# Altium PCB Driver_BLDC.PcbDoc (part 4 of 4)
Units mm, origin at the board's own origin, x right, y up, seen from the top; angles counter-clockwise.
Board outline 320 x 180.01 mm, 2 copper layers (Top Layer, Bottom Layer), stack 1.371 mm thick; 421 components, 171 nets, 1112 pads, 449 vias.
Unrouted connection lines stored in the file: 1.
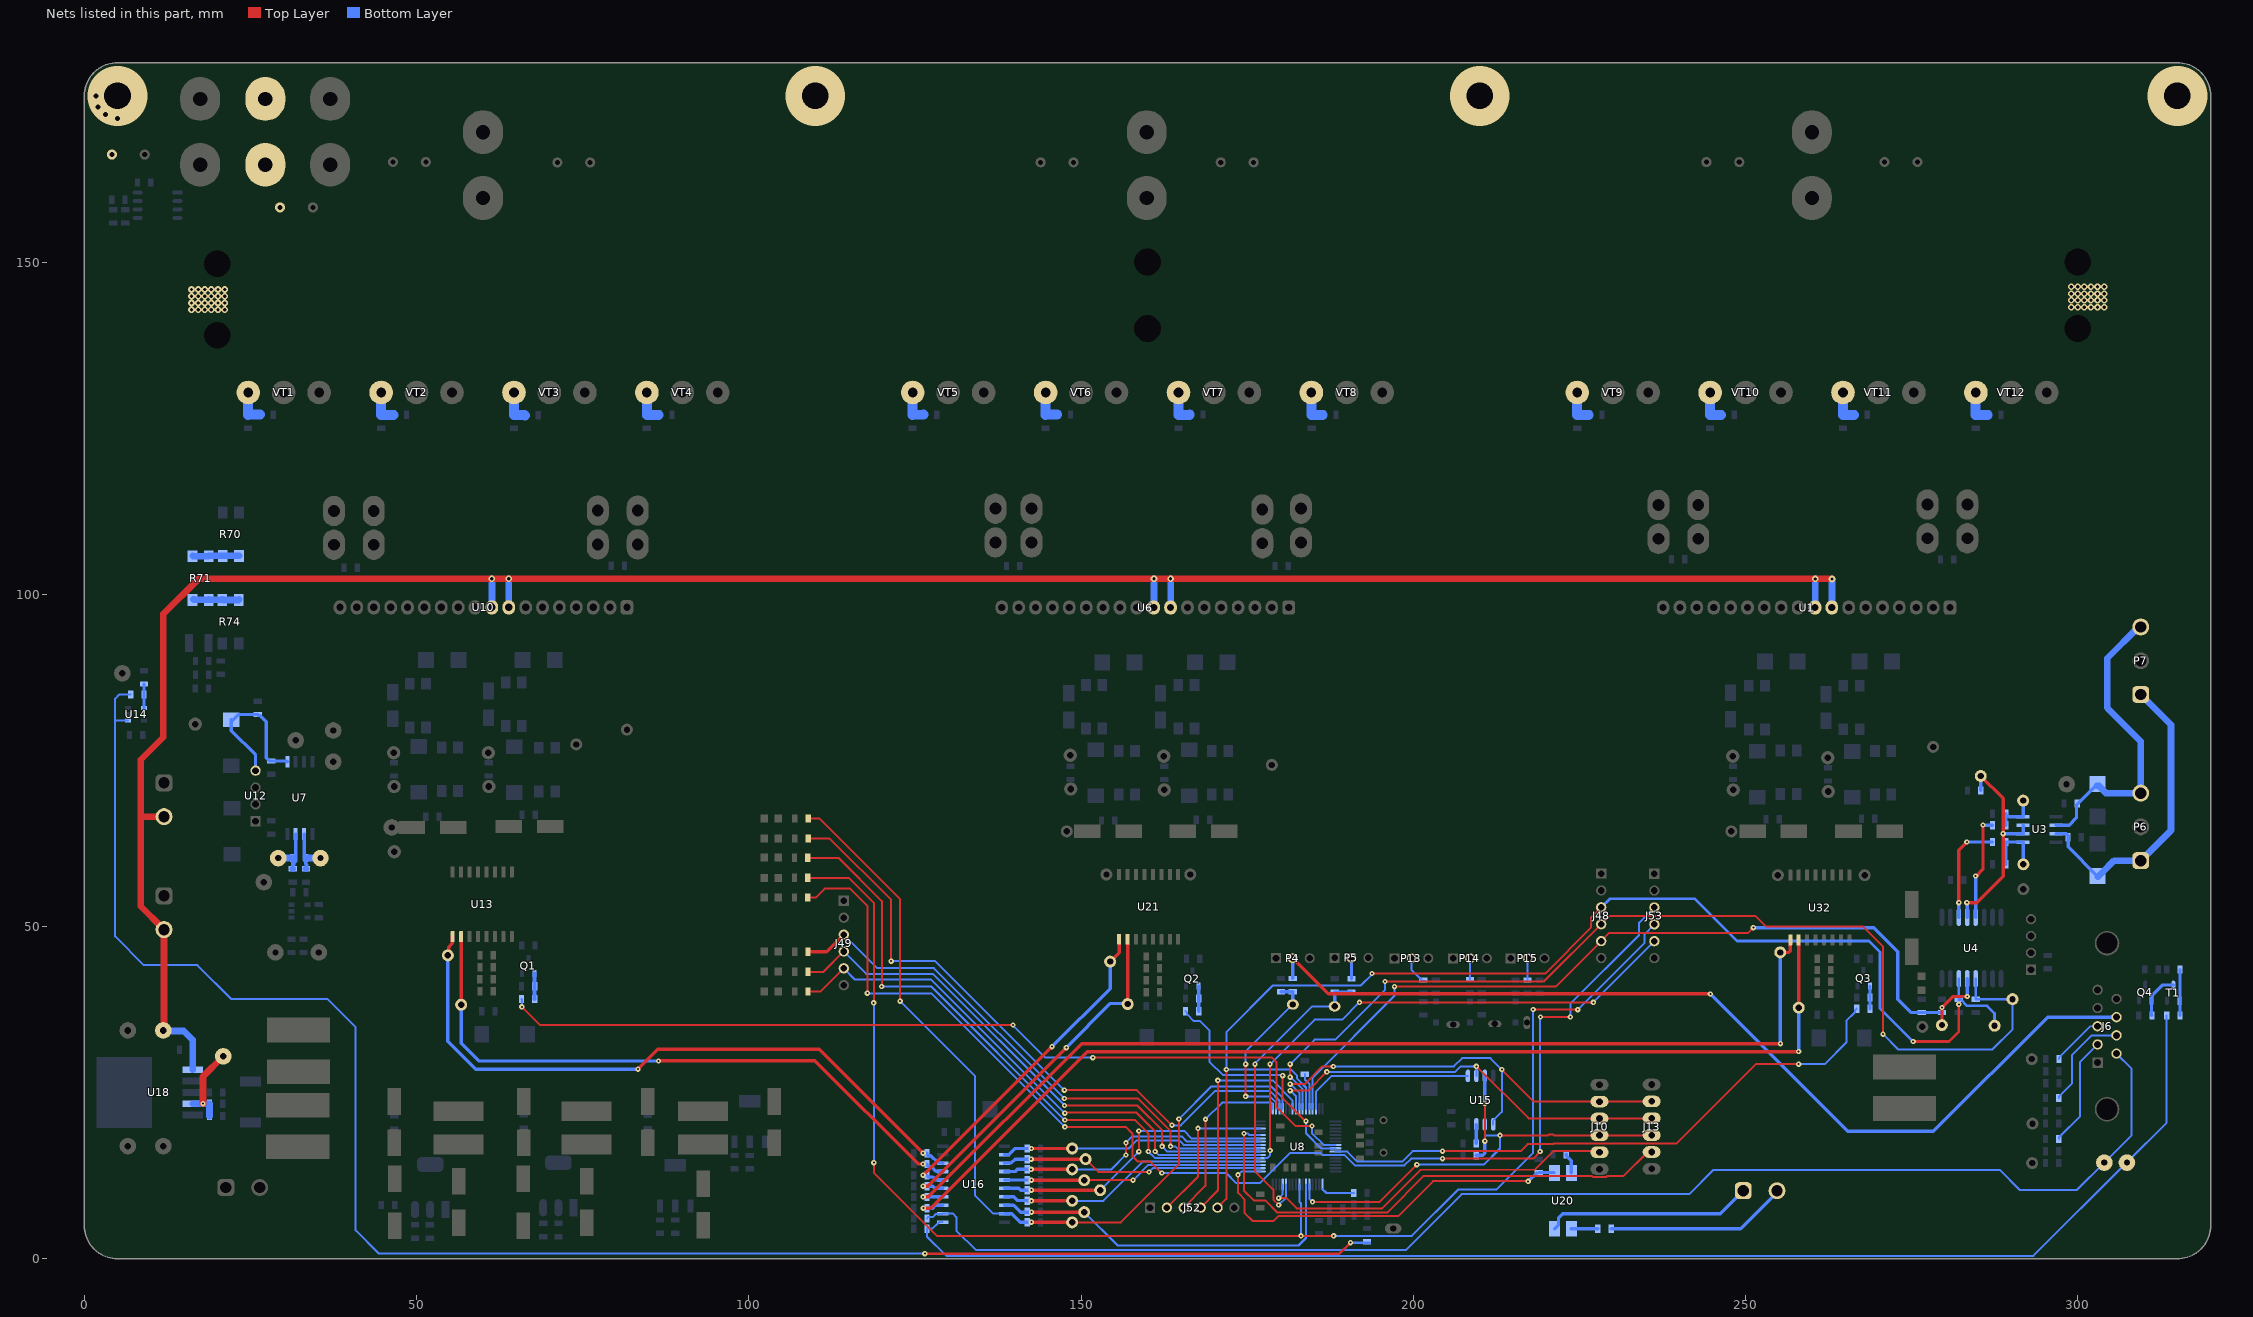
[diagram p3: the nets of this part, all layers, seen from the top]

## Via types
v1: diameter 1, hole 0.5, Top Layer to Bottom Layer, 222 vias
v2: diameter 0.8, hole 0.3, Top Layer to Bottom Layer, 162 vias
v3: diameter 0.8, hole 0.3, Top Layer to Bottom Layer, tented both sides, 29 vias
v4: diameter 1, hole 0.5, Top Layer to Bottom Layer, tented both sides, 21 vias
v5: diameter 1.27, hole 0.711, Top Layer to Bottom Layer, 5 vias
v6: diameter 9, hole 4, Top Layer to Bottom Layer, 4 vias
v7: diameter 0.6, hole 0.3, Top Layer to Bottom Layer, 3 vias
v8: diameter 2, hole 1, Top Layer to Bottom Layer, 1 vias
v9: diameter 0.7, hole 0.3, Top Layer to Bottom Layer, tented both sides, 1 vias
v10: diameter 1, hole 0.54, Top Layer to Bottom Layer, 1 vias

## Nets (pads, with @x,y where several pads share a name; then routed paths per layer and width w, separated by ;. In a path a pad name is that pad's centre, name@x,y a point inside that pad or via, vN(x,y) a via of type N, cw(c..) or ccw(c..) an arc to the next point about the centre after c; other vN are vias at no path point) (continued)
NetJ6_2: J6.2 R3.1 | length 16.6
  Bottom Layer w0.3: R3.1@297.15,18.025 297.15,18.25 297.4,18.5 300.3,21.4 300.3,29.57 J6.2@302.985,32.255
NetJ6_3: J6.3 R1.1 | length 8
  Bottom Layer w0.3: R1.1@297.161,30.054 297.161,30.279 297.411,30.529 297.429,30.529 301.895,34.995 J6.3@302.985,34.995
NetJ6_6: J6.6 R34.2 TP65.1 U16.12 | length 207.7
  Bottom Layer w0.3: R34.2@126.805,6.093 R34.2@126.82,6.077 ; R34.2@126.97,6.258 127.678,6.258 128.176,6.757 129.146,6.757 U16.12@129.171,6.782 130.743,6.782 131.252,6.273 131.252,4.248 134.2,1.3 198.85,1.3 207.275,9.725 241.525,9.725 245.175,13.375 288.25,13.375 291.275,10.35 299.875,10.35 TP65.1@304.005,14.48 308.05,18.525 308.05,28.66 J6.6@305.825,30.885
NetJ6_7: J6.7 R2.1 | length 15.2
  Bottom Layer w0.3: R2.1@297.15,24.189 297.15,24.414 297.4,24.664 297.414,24.664 299.095,26.345 299.095,30.645 302.075,33.625 J6.7@305.825,33.625
NetJ6_8: J6.8 P4.2 R22.1 | length 144.9
  Top Layer w0.5: P4.2@181.871,45.237 187.233,39.875 244.675,39.875 v2(244.7,39.85)
  Bottom Layer w0.5: R22.1@181.871,42.193 P4.2@181.871,45.237 ; v2(244.7,39.85) 265.375,19.175 278.275,19.175 295.465,36.365 J6.8@305.825,36.365
NetJ10_2: J10.2 J13.2 U8.57 U15.5 | length 71
  Top Layer w0.3: v2(181.468,26.278) 183.645,26.278 186.314,28.947 v2(187.977,28.947) ; v2(213.325,28.475) 218.14,23.66 J10.2@227.946,23.66 ; J10.2@228.024,23.66 J13.2@235.124,23.66
  Bottom Layer w0.3: v2(181.468,26.278) 181.546,26.278 182.851,24.973 U8.57@182.851,22.573 ; v2(187.977,28.947) 206.097,28.947 207.349,30.2 211.6,30.2 v2(213.325,28.475) 213.325,22.111 212.03,20.816 U15.5@212.03,20.225
NetJ10_3: J10.3 J13.3 U8.56 U15.2 | length 62.8
  Top Layer w0.3: v2(181.468,25.298) 184.173,25.298 v2(187,28.125) ; v2(209.49,28.975) 217.345,21.12 J13.3@235.124,21.12
  Bottom Layer w0.3: v2(181.468,25.298) 181.529,25.298 182.351,24.475 U8.56@182.351,22.573 ; v2(187,28.125) 187.05,28.075 206.259,28.075 207.16,28.975 v2(209.49,28.975) ; U15.2@209.49,27.525 v2@209.49,28.725
NetJ10_4: J10.4 J13.4 U8.21 U15.6 | length 62.4
  Top Layer w0.3: v2(184.835,8.569) 194.94,8.569 v2(200.537,14.165) ; v2(213.05,18.575) 213.055,18.58 220.298,18.58 220.423,18.705 221.027,18.705 221.152,18.58 J10.4@228.024,18.58 J13.4@235.124,18.58
  Bottom Layer w0.3: U8.21@184.351,11.19 184.351,9.053 v2(184.835,8.569) ; v2(200.537,14.165) 210.621,14.165 213.05,16.595 v2(213.05,18.575) 210.936,18.575 210.76,18.751 U15.6@210.76,20.225
NetJ10_5: J10.5 U8.29 | length 54.8
  Top Layer w0.3: v3(179.741,9.132) 180.929,9.132 182.462,7.6 195.325,7.6 201.125,13.4 218.3,13.4 221.09,16.19 J10.5@228.024,16.19
  Bottom Layer w0.3: v3(179.741,9.132) 179.793,9.132 180.351,9.69 U8.29@180.351,11.19
NetJ13_5: J13.5 U8.44 | length 77.7
  Top Layer w0.3: v3(174.525,18.861) 174.525,10.273 176.048,8.75 177.766,8.75 179.566,6.95 196.075,6.95 201.604,12.479 226.866,12.479 227.05,12.295 228.998,12.295 229.182,12.479 231.658,12.479 235.244,16.065 J13.5@235.865,16.065
  Bottom Layer w0.3: v3(174.525,18.861) 175.1,18.861 175.33,18.631 U8.44@176.91,18.631
NetJ48_3: J48.3 J52.5 R25.1 TP14.1 U4.6 U8.59 | length 194.3
  Top Layer w0.3: J52.5@170.54,7.7 171.875,9.035 v2(171.875,28.5) ; v2(193.8,42.925) 193.824,42.949 194.426,42.949 194.451,42.925 219.832,42.925 226.775,49.868 226.775,51.386 J48.3@228.279,52.89
  Top Layer w0.4: v2(275.225,32.7) 280.625,32.7 282.095,34.17 v2(282.095,38.3)
  Bottom Layer w0.3: U8.59@183.851,22.573 183.851,25.775 182.507,27.119 182.507,27.568 181.576,28.5 v2(171.875,28.5) 171.875,34.125 178.877,41.127 192.077,41.127 193.8,42.85 v2(193.8,42.925)
  Bottom Layer w0.4: J48.3@228.279,52.89 229.564,54.175 242.375,54.175 248.73,47.82 268.555,47.82 270.225,46.15 270.225,37.7 v2(275.225,32.7) ; v2(282.095,38.3) R25.1@282.095,39.078 ; U4.6@282.096,42.143 R25.1@282.095,39.078 ; TP14.1@287.475,34.535 TP14.1@287.475,35.075 287.475,36.931 286.328,38.078 283.32,38.078 282.32,39.078 R25.1@282.095,39.078 ; TP14.1@287.793,34.935 TP14.1@287.88,35.131
NetJ48_4: J48.4 R28.1 TP11.1 U4.4 U8.58 | length 156.7
  Top Layer w0.3: v2(181.468,27.327) v2(181.468,29.299) ; v2(195.75,41.727) 219.656,41.727 J48.4@228.279,50.35 229.539,51.61 251.49,51.61 253.075,50.025 267.609,50.025 270.7,46.934 v2(270.7,33.8)
  Bottom Layer w0.3: v2(181.468,27.327) 181.528,27.327 183.351,25.504 U8.58@183.351,22.573 ; v2(181.468,29.299) 185.144,32.975 188.25,32.975 195.75,40.475 v2(195.75,41.727) ; v2(270.7,33.8) 273,31.5 287.145,31.5 290.18,34.535 TP11.1@290.18,39.078
  Bottom Layer w0.4: R28.1@284.635,39.078 TP11.1@290.18,39.078 ; R28.1@284.635,39.078 U4.4@284.636,42.143
NetJ48_5: J48.5 R39.2 R40.2 TP10.1 U4.5 U8.61 | length 129.5
  Top Layer w0.3: v2(197.177,40.952) 221.421,40.952 J48.5@228.279,47.81 229.519,49.05 250.4,49.05 v2(251.175,49.825)
  Top Layer w0.5: TP10.1@279.555,35.172 v3(279.555,37.808) 281.225,39.478 v3(283.366,39.478)
  Bottom Layer w0.3: U8.61@184.851,22.573 184.851,27.254 197.177,39.58 v2(197.177,40.952)
  Bottom Layer w0.5: v2(251.175,49.825) 269.3,49.825 272.898,46.227 272.898,39.077 274.897,37.078 R39.2@276.52,37.078 R40.2@279.555,37.078 v3(279.555,37.808) ; v3(283.366,39.478) U4.5@283.366,42.143
NetJ49_3: J49.3 R12.2 U8.40 | length 83.7
  Top Layer w0.3: v2(147.482,24.132) 158.518,24.132 163.475,19.175 v2(163.475,16.925)
  Top Layer w0.5: R12.2@108.905,46.19 111.7,46.19 J49.3@114.3,48.79
  Bottom Layer w0.3: J49.3@114.3,48.79 119.34,43.75 127.865,43.75 v2(147.482,24.132) ; v2(163.475,16.925) 164.2,16.925 164.494,16.631 U8.40@176.91,16.631
NetJ49_4: J49.4 R11.2 U8.39 | length 83.2
  Top Layer w0.3: R11.2@108.905,43.19 111.24,43.19 J49.4@114.3,46.25 ; v2(147.516,23.066) 158.484,23.066 162.2,19.35 v2(162.2,16.925)
  Bottom Layer w0.3: J49.4@114.3,46.25 117.675,42.875 127.707,42.875 v2(147.516,23.066) ; v2(162.2,16.925) 162.994,16.131 U8.39@176.91,16.131
NetJ49_5: J49.5 R10.2 U8.38 | length 83
  Top Layer w0.3: R10.2@108.905,40.19 110.78,40.19 J49.5@114.3,43.71 ; v2(147.549,21.921) 147.645,22.017 147.967,22.017 147.975,22.025 158.275,22.025 161.132,19.168 161.132,16.175 v2(161.151,16.157)
  Bottom Layer w0.3: J49.5@114.3,43.71 115.985,42.025 127.446,42.025 v2(147.549,21.921) ; v2(161.151,16.157) 161.151,16.107 161.626,15.631 U8.38@176.91,15.631
NetJ52_2: J52.2 U8.46 | length 23.2
  Top Layer w0.3: J52.2@162.92,7.7 167.6,12.38 v2(167.6,19.625)
  Bottom Layer w0.3: v2(167.6,19.625) 167.606,19.631 U8.46@176.91,19.631
NetJ52_3: J52.3 U8.49 | length 26.6
  Top Layer w0.3: J52.3@165.46,7.7 168.725,10.965 v2(168.725,21)
  Bottom Layer w0.3: v2(168.725,21) 171.225,23.5 178.669,23.5 178.845,23.325 178.845,23.32 178.851,23.314 U8.49@178.851,22.573
NetJ52_4: J52.4 U8.55 | length 34
  Top Layer w0.3: J52.4@168,7.7 170.575,10.275 v2(170.575,26.85)
  Bottom Layer w0.3: v2(170.575,26.85) 178.818,26.85 181.851,23.817 U8.55@181.851,22.573
NetJ53_3: J53.3 R7.2 U8.11 | length 188.8
  Top Layer w0.3: R7.2@108.88,54.366 110.092,54.366 111.419,55.692 115.267,55.692 117.851,53.109 v2(117.85,39.975) ; v2(147.549,19.85) 156.739,19.85 157.731,18.857 157.731,15.469 158.569,14.631 160.398,14.631 162.128,12.901 v2(162.15,12.901) ; v2(204.391,15.071) 218.021,15.071 v2(219.1,16.15) ; v2(219.15,36.375) 223.6,36.375 v2(223.625,36.4)
  Bottom Layer w0.3: v2(117.85,39.975) 117.875,39.95 127.449,39.95 v2(147.549,19.85) ; v2(162.15,12.901) 162.164,12.915 171.835,12.915 173.35,11.4 176.895,11.4 179.205,13.71 179.213,13.71 181.454,15.95 186.001,15.95 186.32,15.631 U8.11@188.292,15.631 189.628,15.631 191.209,14.05 198.65,14.05 199.671,15.071 v2(204.391,15.071) ; v2(219.1,16.15) 219.1,36.325 v2(219.15,36.375) ; v2(223.625,36.4) 223.625,38.375 233.975,48.725 233.975,50.576 J53.3@236.279,52.88
NetJ53_4: J53.4 R8.2 U8.24 | length 214.2
  Top Layer w0.3: R8.2@108.88,57.366 108.904,57.341 115.034,57.341 118.825,53.55 118.825,38.534 v2(118.8,38.509) ; v2(118.825,14.475) 118.825,12.92 128.295,3.45 v2(183.105,3.45) v2(188.025,3.45) ; v2(218.05,37.525) 218.075,37.5 v2(224.75,37.5)
  Bottom Layer w0.3: v2(118.8,38.509) 118.825,38.484 v2(118.825,14.475) ; U8.24@182.851,11.19 182.851,8.576 183.105,8.322 v2(183.105,3.45) ; v2(188.025,3.45) 199.8,3.45 206.8,10.45 212.543,10.45 218.05,15.957 v2(218.05,37.525) ; v2(224.75,37.5) 234.8,47.55 234.8,48.861 J53.4@236.279,50.34
NetJ53_5: J53.5 R9.2 U8.37 | length 176.1
  Top Layer w0.3: R9.2@108.88,60.366 108.928,60.317 113.508,60.317 120.017,53.808 120.017,40.992 v2(120,40.975) ; v2(147.55,20.9) 158.082,20.9 159.555,19.427 160.125,18.857 v2(160.125,16.15) ; v2(178.45,29.3) v2(178.45,29.3) v2(178.451,16.288) ; v2(191.9,38.6) v2(227.1,38.6)
  Bottom Layer w0.3: v2(120,40.975) 127.425,40.975 147.5,20.9 v2(147.55,20.9) ; v2(160.125,16.15) 161.144,15.131 U8.37@176.91,15.131 ; U8.37@177.648,15.118 177.675,15.145 178.033,15.145 178.451,15.563 v2(178.451,16.288) ; v2(178.45,29.3) 185.15,36 189.3,36 v2(191.9,38.6) ; v2(227.1,38.6) 236.275,47.775 J53.5@236.275,47.8
NetP1_1: P1.1 U20.2 | length 31.4
  Bottom Layer w0.5: U20.2@221.255,4.525 221.855,5.125 221.855,6.155 222.5,6.8 246.21,6.8 P1.1@249.66,10.25
NetP1_2: P1.2 R127.1 | length 27.5
  Bottom Layer w0.5: R127.1@229.775,4.525 249.25,4.525 254.74,10.015 P1.2@254.74,10.25
NetP5_2: P5.2 R23.1 | length 3.2
  Bottom Layer w0.5: R23.1@190.701,42.127 P5.2@190.701,45.287
NetP6_1: P6.1 P7.1 R41.2 U3.7 ZD2.1 | length 46
  Bottom Layer w0.5: U3.7@296.711,63.982 298.261,63.982 298.548,63.695 298.548,61.978 ZD2.1@302.946,57.581
  Bottom Layer w1: ZD2.1@303.034,57.492 303.558,58.016 305.462,59.92 P6.1@309.475,59.92 ; P7.1@309.475,84.92 314.025,80.37 314.025,64.47 P6.1@309.519,59.964
NetP6_3: P6.3 P7.3 R24.1 U3.6 ZD1.1 | length 46.4
  Bottom Layer w0.5: U3.6@296.711,65.252 296.726,65.267 298.7,65.267 299.796,66.363 299.796,68.278 299.97,68.452 ZD1.1@302.946,71.428
  Bottom Layer w1: ZD1.1@302.858,71.168 303.205,71.168 303.646,70.728 303.646,70.666 304.231,70.08 P6.3@309.475,70.08 309.475,77.85 304.425,82.9 304.425,90.375 309.13,95.08 P7.3@309.475,95.08
NetP13_2: P13.2 R120.1 | length 4.4
  Bottom Layer w0.3: P13.2@199.717,45.225 199.717,43.517 201.431,41.802 R120.1@201.656,41.802
NetP14_2: P14.2 R121.1 | length 3.2
  Bottom Layer w0.3: R121.1@208.532,42.027 P14.2@208.532,45.225
NetP15_2: P15.2 R122.1 | length 3.4
  Bottom Layer w0.3: P15.2@217.1,45.123 P15.2@217.202,45.225 R122.1@217.202,41.952
NetQ1_1: Q1.1 R84.2 R88.1 | length 3.8
  Bottom Layer w0.6: R84.2@67.784,39.083 Q1.1@67.784,42.914
NetQ2_1: Q2.1 R111.2 R113.1 | length 3.8
  Bottom Layer w0.5: R111.2@167.71,37.269 Q2.1@167.71,41.02
NetQ3_1: Q3.1 R140.2 R143.1 | length 3.4
  Bottom Layer w0.5: R140.2@268.724,37.631 Q3.1@268.725,41.053
NetQ4_1: Q4.1 R48.2 T1.3 | length 7
  Bottom Layer w0.5: R48.2@311.174,36.6 311.099,36.675 311.099,39.626 311.15,39.677 311.201,39.677 312.724,41.2 T1.3@314.374,41.2
NetR13_2: R13.2 U15.7 | length 2.9
  Bottom Layer w0.5: R13.2@209.475,17.35 U15.7@209.475,20.21
NetR14_2: R14.2 U15.3 | length 13.1
  Top Layer w0.3: v2(210.76,17.7) v2(210.76,23.375)
  Bottom Layer w0.5: R14.2@209.475,15.574 R14.2@209.625,15.574 ; R14.2@209.625,15.575 210.467,15.575 210.775,15.882 210.775,17.685 v2(210.76,17.7) ; v2(210.76,23.375) U15.3@210.76,27.525
NetR15_2: R15.2 R47.2 TP4.1 U8.52 U16.9 | length 130.9
  Top Layer w0.3: R47.2@108.929,66.255 110.646,66.254 122.775,54.125 v2(122.775,38.775) ; v2(142.521,5.512) v2@142.556,5.477 ; TP4.1@148.66,5.477 156.002,5.477 164.725,14.2 v2(164.725,21.025)
  Top Layer w0.5: v2@142.556,5.477 TP4.1@148.66,5.477
  Bottom Layer w0.3: v2(122.775,38.775) 134.025,27.525 134.025,9.575 136.818,6.782 U16.9@138.471,6.782 U16.9@138.488,6.766 ; v2(164.725,21.025) 169.625,25.925 178.639,25.925 180.351,24.213 U8.52@180.351,22.573
  Bottom Layer w0.5: U16.9@138.488,6.766 139.588,6.766 140.842,5.512 v2(142.521,5.512)
NetR16_2: R16.2 TP12.1 U8.22 U16.8 | length 56.4
  Top Layer w0.3: v2(142.556,7.008) v2@142.576,7.027
  Top Layer w0.5: v2@142.576,7.027 TP12.1@150.475,7.027
  Bottom Layer w0.3: TP12.1@150.475,7.027 155.502,2 182.725,2 183.851,3.126 U8.22@183.851,11.19
  Bottom Layer w0.5: U16.8@138.471,8.052 139.847,8.052 140.891,7.008 v2(142.556,7.008)
NetR17_2: R17.2 TP15.1 U8.36 U16.7 | length 41
  Top Layer w0.5: v2(142.521,8.727) TP15.1@148.66,8.727
  Bottom Layer w0.3: TP15.1@148.66,8.727 153.352,8.727 159.256,14.631 U8.36@176.794,14.631
  Bottom Layer w0.5: U16.7@138.471,9.322 139.876,9.322 140.421,8.777 141.846,8.777 R17.2@141.896,8.727 v2(142.521,8.727)
NetR18_2: R18.2 TP17.1 U8.43 U16.6 | length 44.2
  Top Layer w0.3: v2(158.7,16.125) 158.725,16.15 158.725,19.22 v2(158.7,19.245)
  Top Layer w0.5: v2(142.521,10.317) TP17.1@152.686,10.317
  Bottom Layer w0.3: TP17.1@152.871,10.317 v2@158.679,16.125 ; v2(158.7,19.245) 165.505,19.245 166.619,18.131 U8.43@176.794,18.131
  Bottom Layer w0.5: U16.6@138.471,10.592 140.616,10.592 140.891,10.317 R18.2@141.896,10.317 ; R18.2@141.896,10.317 v2(142.521,10.317)
NetR19_2: R19.2 TP18.1 U8.35 U16.5 | length 39.4
  Top Layer w0.3: TP18.1@150.475,11.827 150.477,11.825 v2(157.825,11.825)
  Top Layer w0.5: v2(142.521,11.827) TP18.1@150.475,11.827
  Bottom Layer w0.3: v2(157.825,11.825) 160.125,14.125 160.621,14.125 175.042,14.125 175.048,14.131 U8.35@176.91,14.131
  Bottom Layer w0.5: U16.5@138.471,11.862 142.486,11.862 v2(142.521,11.827)
NetR20_2: R20.2 TP19.1 U8.42 U16.4 | length 42
  Top Layer w0.3: v2(156.756,15.631) v2(156.756,17.45)
  Top Layer w0.5: v2(142.486,13.457) TP19.1@148.66,13.457
  Bottom Layer w0.3: TP19.1@148.66,13.457 154.582,13.457 v2(156.756,15.631) ; v2(156.756,17.45) 157.731,18.425 165.15,18.425 165.944,17.631 U8.42@176.91,17.631
  Bottom Layer w0.5: U16.4@138.471,13.132 140.096,13.132 140.421,13.457 R20.2@141.896,13.457 v2(142.486,13.457)
NetR21_2: R21.2 TP27.1 U8.34 U16.3 | length 39.7
  Top Layer w0.3: TP27.1@150.683,15.002 152.635,13.05 v2(160.225,13.05)
  Top Layer w0.5: v2(142.486,15.002) TP27.1@150.683,15.002
  Bottom Layer w0.3: v2(160.225,13.05) 160.806,13.631 U8.34@176.91,13.631
  Bottom Layer w0.5: U16.3@138.471,14.402 138.496,14.427 139.521,14.427 140.096,15.002 R21.2@141.896,15.002 v2(142.486,15.002)
NetR22_2: R22.2 R29.2 TP8.1 U8.50 | length 26.1
  Top Layer w0.3: v2(174.775,24.45) v2(174.775,29.3)
  Bottom Layer w0.3: v2(174.775,24.45) 178.399,24.45 179.349,23.5 179.349,22.575 U8.50@179.351,22.573 ; v2(174.775,29.3) 174.725,29.35 174.725,31.133 TP8.1@181.871,38.279
  Bottom Layer w0.5: R29.2@180.081,40.193 R22.2@181.871,40.193 ; TP8.1@181.871,38.279 R22.2@181.871,39.925
NetR23_2: R23.2 R30.2 TP7.1 U8.28 | length 47.1
  Top Layer w0.3: v2(176.175,29.299) 176.172,29.296 176.172,13.153 178.926,10.399 178.926,8.914 v3(179.741,8.1)
  Bottom Layer w0.3: v2(176.175,29.299) 176.175,29.375 184.787,37.987 TP7.1@188.161,37.987 ; v3(179.741,8.1) 180.851,9.21 180.851,10.846 180.837,10.86 U8.28@180.837,11.19
  Bottom Layer w0.5: TP7.1@188.02,37.446 TP7.1@188.02,37.845 ; TP7.1@188.161,37.987 188.161,39.727 R30.2@188.561,40.127 ; R30.2@188.161,40.127 R30.2@188.561,40.127 ; R23.2@190.701,40.127 R30.2@188.561,40.127
NetR26_1: R26.1 R32.1 TP9.1 U3.4 | length 6.9
  Bottom Layer w0.5: R32.1@289.176,65.252 R26.1@289.176,66.757 ; R26.1@289.176,66.982 R26.1@289.176,66.757 ; TP9.1@291.781,68.959 U3.4@291.781,66.522 289.636,66.522 289.551,66.607 289.326,66.607 R26.1@289.176,66.757
NetR27_1: R27.1 R36.1 TP16.1 U3.1 | length 9.3
  Bottom Layer w0.5: R27.1@289.176,59.367 R36.1@289.176,62.712 U3.1@291.781,62.712 ; U3.1@291.781,62.712 291.791,62.712 291.806,62.697 TP16.1@291.806,59.367
NetR31_2: R31.2 TP31.1 U8.41 U16.2 | length 39.6
  Top Layer w0.5: v2(142.521,16.602) TP31.1@148.66,16.602
  Bottom Layer w0.3: TP31.1@148.66,16.602 157.177,16.602 158.4,17.825 164.75,17.825 165.43,17.145 176.155,17.145 176.169,17.131 U8.41@176.91,17.131
  Bottom Layer w0.5: U16.2@138.471,15.672 138.496,15.697 139.191,15.697 140.096,16.602 v2(142.521,16.602)
NetR32_2: R32.2 U4.13 | length 15.8
  Top Layer w0.5: v3(284.636,57.597) 284.713,57.597 285.731,58.614 v3(285.731,65.272)
  Bottom Layer w0.5: U4.13@284.636,51.393 284.658,51.415 284.658,57.575 v3(284.636,57.597) ; v3(285.731,65.272) 285.75,65.252 R32.2@287.176,65.252
NetR33_2: R33.2 R55.1 TP64.1 U16.11 | length 216.1
  Bottom Layer w0.3: U16.11@129.171,5.512 128.596,5.512 128.571,5.487 128.571,5.465 127.678,4.571 126.87,4.571 R33.2@126.82,4.522 126.82,3.33 129.72,0.43 293.33,0.43 307.39,14.49 313.374,20.474 R55.1@313.374,36.6
NetR35_2: R35.2 TP40.1 U16.13 U32.2 | length 161.4
  Top Layer w0.5: v2(126.267,7.622) 127.397,7.622 150.95,31.175 257.975,31.175 v2(258,31.2) ; TP40.1@258.002,37.788 U32.2@258.002,47.979
  Bottom Layer w0.5: v2(126.267,7.622) R35.2@126.82,7.622 127.679,7.622 128.084,8.027 129.146,8.027 U16.13@129.171,8.052 ; v2(258,31.2) 258.002,31.202 TP40.1@258.002,37.788
NetR36_2: R36.2 U4.11 | length 15.7
  Top Layer w0.5: v2(282.096,53.6) 282.096,61.505 v3(283.303,62.712)
  Bottom Layer w0.5: U4.11@282.096,51.393 v2(282.096,53.6) ; v3(283.303,62.712) R36.2@287.176,62.712
NetR37_2: R37.2 TP41.1 U16.14 U32.1 | length 158
  Top Layer w0.5: v2(126.251,9.322) 127.022,9.322 150.075,32.375 v2(255.275,32.375) ; TP41.1@255.68,46.105 256.518,46.105 256.732,46.319 U32.1@256.732,47.979
  Bottom Layer w0.5: v2(126.251,9.322) U16.14@129.171,9.322 ; TP41.1@255.223,46.105 255.223,32.427 v2(255.275,32.375)
NetR38_2: R38.2 TP13.1 U3.2 U3.3 U4.12 | length 32.6
  Top Layer w0.5: v2(283.308,53.6) 284.792,53.6 288.776,57.583 v3(288.776,63.982) 288.776,69.271 TP13.1@285.396,72.651
  Bottom Layer w0.5: v2(283.308,53.6) 283.308,53.519 283.366,53.461 U4.12@283.366,51.393 ; R38.2@285.396,70.487 TP13.1@285.396,72.651 TP13.1@285.396,72.961 ; v3(288.776,63.982) U3.2@291.781,63.982 U3.3@291.781,65.252
NetR42_2: R42.2 TP42.1 U16.15 U21.2 | length 55.7
  Top Layer w0.5: v2(126.251,10.932) 126.932,10.932 v2(147.775,31.775) ; TP42.1@157.008,38.125 U21.2@157.008,48.086
  Bottom Layer w0.5: v2(126.251,10.932) 126.82,10.932 127.679,10.932 128.017,10.594 129.169,10.594 U16.15@129.171,10.592 ; v2(147.775,31.775) 154.425,38.425 TP42.1@157.499,38.425
NetR43_2: R43.2 TP43.1 U16.16 U21.1 | length 51
  Top Layer w0.5: v2(126.251,12.577) 145.6,31.925 v2(145.625,31.925) ; TP43.1@154.374,44.728 155.738,46.092 U21.1@155.738,48.086
  Bottom Layer w0.5: v2(126.251,12.577) 126.713,12.577 126.97,12.32 127.649,12.32 128.082,11.887 129.146,11.887 U16.16@129.171,11.862 ; v2(145.625,31.925) 154.374,40.674 TP43.1@154.374,44.728
NetR44_2: R44.2 TP46.1 U13.2 U16.17 | length 96.7
  Top Layer w0.5: TP46.1@56.711,38.232 U13.2@56.711,48.476 ; v2(86.404,29.775) 86.454,29.825 109.925,29.825 125.483,14.267 v2(126.251,14.267)
  Bottom Layer w0.5: TP46.1@56.711,38.232 56.711,32.418 59.354,29.775 v2(86.404,29.775) ; v2(126.251,14.267) R44.2@126.82,14.267 126.82,14.042 126.97,13.892 127.429,13.892 128.164,13.157 129.146,13.157 U16.17@129.171,13.132
NetR45_2: R45.2 TP47.1 U13.1 U16.18 | length 100.7
  Top Layer w0.5: TP47.1@54.714,45.661 54.824,45.771 54.824,46.885 55.391,47.452 55.391,48.426 U13.1@55.441,48.476 ; v2(83.315,28.539) 86.294,31.518 110.62,31.518 v2(126.251,15.886)
  Bottom Layer w0.5: TP47.1@54.714,45.661 54.714,32.711 58.886,28.539 v2(83.315,28.539) ; v2(126.251,15.886) R45.2@126.82,15.886 126.82,15.661 126.97,15.511 127.397,15.511 128.482,14.427 129.146,14.427 U16.18@129.171,14.402
NetR46_2: R46.2 U8.51 | length 98.6
  Top Layer w0.3: R46.2@109.179,62.995 R46.2@108.929,63.245 112.18,63.245 121.425,54 v2(121.425,44.8) ; v2(147.482,25.375) 158.4,25.375 v2(163.675,20.1)
  Bottom Layer w0.3: v2(121.425,44.8) 128.057,44.8 v2(147.482,25.375) ; v2(163.675,20.1) 163.7,20.075 165.025,20.075 170.225,25.275 178.399,25.275 179.851,23.823 U8.51@179.851,22.573
NetR55_2: R55.2 R56.1 T1.1 | length 6.9
  Bottom Layer w0.5: R55.2@315.374,36.6 R56.1@315.374,43.521
NetR57_1: R57.1 R64.2 U14.1 | length 267.5
  Top Layer w0.36: v2(126.484,0.775) 188.89,0.775 v2(190.54,2.425)
  Bottom Layer w0.3: U14.1@6.597,81.001 4.642,81.001 ; R64.2@6.976,84.922 5.267,84.922 4.642,84.297 4.642,81.001 ; v2(126.484,0.775) 44.35,0.775 40.85,4.275 40.85,34.85 36.625,39.075 22.15,39.075 17.025,44.2 8.975,44.2 4.642,48.533 4.642,81.001
  Bottom Layer w0.36: v2(190.54,2.425) R57.1@193.44,2.425
NetR59_2: R59.2 U8.60 | length 5.5
  Bottom Layer w0.3: R59.2@183.684,27.787 183.684,26.984 184.351,26.317 U8.60@184.351,22.573
NetR63_2: R63.2 U8.17 | length 4.9
  Bottom Layer w0.36: U8.17@186.367,10.452 186.923,9.896 R63.2@191.025,9.896
NetR64_1: R64.1 R66.2 U14.4 | length 3.6
  Bottom Layer w0.5: U14.4@8.975,82.922 R66.2@8.975,86.512
NetR67_1: R67.1 R68.2 TP61.1 U18.4 | length 12.8
  Top Layer w1: v2(17.86,23.338) 17.86,27.416 TP61.1@20.914,30.47
  Bottom Layer w1: U18.4@16.335,23.338 R67.1@18.848,23.338 R68.2@18.848,21.476
NetR70_1: R70.1 R71.2 | length 6.8
  Bottom Layer w1: R71.2@16.343,105.775 16.393,105.725 18.675,105.725 18.725,105.775 R70.1@20.403,105.775 ; R70.1@20.6,105.775 R70.1@23.277,105.775
NetR71_1: R71.1 R74.2 | length 7.1
  Bottom Layer w1: R71.1@16.437,99.25 16.437,99.238 16.5,99.175 18.65,99.175 18.725,99.25 18.812,99.162 20.687,99.162 20.775,99.25 20.875,99.15 23.237,99.15 R74.2@23.337,99.25
NetR83_2: R83.2 R87.2 VT1.1 | length 5.2
  Bottom Layer w1.5: VT1.1@24.666,130.369 24.638,130.341 R83.2@24.638,127.004 24.67,127.036 R87.2@26.432,127.036
NetR84_1: R84.1 U8.8 | length 136.9
  Top Layer w0.3: v2(65.836,37.926) 68.566,35.195 v2(139.75,35.195) ; v2(151.775,30.275) 151.8,30.3 178.675,30.3 179.38,29.595 179.38,22.89 182.295,19.975 v2(184.75,19.975)
  Bottom Layer w0.3: R84.1@65.784,39.083 65.836,39.031 v2(65.836,37.926) ; v2(139.75,35.195) 139.75,35.125 144.6,30.275 v2(151.775,30.275) ; v2(184.75,19.975) 184.75,18.889 186.507,17.131 U8.8@188.292,17.131
NetR85_2: R85.2 R86.2 VT2.1 | length 5.2
  Bottom Layer w1.5: VT2.1@44.666,130.369 R85.2@44.666,127.004 R86.2@46.498,127.004
NetR89_2: R89.2 R93.2 VT3.1 | length 5
  Bottom Layer w1.5: VT3.1@64.666,130.369 R89.2@64.666,127.004 66.24,127.004 R93.2@66.31,126.934
NetR90_2: R90.2 R91.2 VT4.1 | length 5.1
  Bottom Layer w1.5: VT4.1@84.666,130.369 R90.2@84.666,127.004 R91.2@86.439,127.004
NetR94_2: R94.2 R99.2 VT5.1 | length 5
  Bottom Layer w1.5: VT5.1@124.666,130.369 124.638,130.341 R94.2@124.638,127.004 124.654,127.02 126.263,127.02 R99.2@126.279,127.036
NetR97_2: R97.2 R98.2 VT6.1 | length 5.1
  Bottom Layer w1.5: VT6.1@144.666,130.369 R97.2@144.666,127.004 144.699,127.037 146.397,127.037 R98.2@146.422,127.061
NetR100_2: R100.2 R103.2 VT7.1 | length 5.1
  Bottom Layer w1.5: VT7.1@164.666,130.369 R100.2@164.666,127.004 166.303,127.004 R103.2@166.361,127.061
NetR101_2: R101.2 R102.2 VT8.1 | length 5.1
  Bottom Layer w1.5: VT8.1@184.666,130.369 184.709,130.326 R101.2@184.709,127.004 184.712,127.007 186.373,127.007 R102.2@186.376,127.01
NetR105_2: R105.2 R109.2 VT9.1 | length 5.1
  Bottom Layer w1.5: VT9.1@224.666,130.369 224.663,130.366 R105.2@224.663,127.004 R109.2@226.406,127.004
NetR106_2: R106.2 R110.2 VT10.1 | length 5
  Bottom Layer w1.5: VT10.1@244.666,130.369 R106.2@244.666,127.004 R110.2@246.32,127.004
NetR111_1: R111.1 U8.9 | length 37.1
  Top Layer w0.3: v2(180.351,27.568) 180.351,24.134 183.78,20.705 v2(183.851,20.705)
  Bottom Layer w0.3: R111.1@165.709,37.268 165.959,37.018 165.959,36.787 166.971,35.775 167.932,35.775 169.325,34.382 169.325,29.675 171.375,27.625 180.294,27.625 v2(180.351,27.568) ; v2(183.851,20.705) 183.851,18.874 186.094,16.631 U8.9@188.292,16.631
NetR112_2: R112.2 R116.2 VT11.1 | length 5
  Bottom Layer w1.5: R112.2@264.666,127.004 VT11.1@264.666,130.369 ; R112.2@264.666,127.004 R116.2@266.335,127.004
NetR114_2: R114.2 R117.2 VT12.1 | length 5.2
  Bottom Layer w1.5: VT12.1@284.666,130.369 284.633,130.335 R114.2@284.633,127.004 R117.2@286.452,127.004
NetR126_2: R126.2 U20.4 | length 3.2
  Bottom Layer w0.5: R126.2@223.015,15.753 223.015,15.528 223.795,14.747 U20.4@223.795,12.925
NetR127_2: R127.2 U20.1 | length 4
  Bottom Layer w0.5: U20.1@223.795,4.525 R127.2@227.775,4.525
NetR128_1: R128.1 U8.33 U20.3 | length 59.5
  Top Layer w0.3: v2(173.628,12.631) 173.628,9.916 174.63,8.914 174.63,6.871 175.801,5.7 178.992,5.7 179.762,6.47 197.795,6.47 203,11.675 217.275,11.675 v2(217.3,11.65)
  Bottom Layer w0.3: v2(173.628,12.631) 174.128,13.131 U8.33@176.91,13.131 ; U20.3@221.186,12.994 U20.3@221.255,12.925
  Bottom Layer w0.5: v2(217.3,11.65) R128.1@218.55,12.9 ; R128.1@218.894,12.994 U20.3@221.186,12.994
NetR140_1: R140.1 U8.10 | length 90.7
  Top Layer w0.3: v2(204.391,16.199) 216.174,16.199 217.22,17.245 221.027,17.245 221.107,17.325 239.6,17.325 251.553,29.278 v2(258.002,29.278)
  Bottom Layer w0.3: U8.10@188.292,16.131 190.064,16.131 191.57,14.625 198.315,14.625 199.889,16.199 v2(204.391,16.199) ; v2(258.002,29.278) 261.913,29.278 265.186,32.551 265.186,35.811 266.474,37.099 266.474,37.381 R140.1@266.724,37.631
NetU8_62: U8.62 U15.1 | length 26.4
  Bottom Layer w0.3: U8.62@185.351,22.573 185.351,25.167 187.709,27.525 U15.1@208.22,27.525
OUT_N: C26.1 R51.1 TP26.1 U7.6 | length 8.6
  Bottom Layer w0.5: U7.6@33.085,63.9 33.085,60.072 33.325,59.832 33.325,59.47 33.475,59.32 ; R51.1@33.37,58.68 C26.1@33.37,60.3
  Bottom Layer w1: R51.1@33.37,58.68 R51.1@33.375,58.675 ; C26.1@33.37,60.3 C26.1@33.365,60.305 TP26.1@35.545,60.305
OUT_P: C26.2 R49.1 TP22.1 U7.7 | length 8.7
  Top Layer w1: TP22.1@29.185,60.305 TP22.1@29.185,60.49
  Bottom Layer w0.5: R49.1@31.365,58.675 C26.2@31.365,60.305
  Bottom Layer w0.58: 31.475,59.32 31.475,59.545 31.815,59.885 U7.7@31.815,63.9
  Bottom Layer w1: TP22.1@29.185,60.305 C26.2@31.365,60.305
PE: C79.2 C80.2 J3.1 | length 10.4
  Top Layer w2: v5(1.775,175) v6@3.904,175 ; v5(3.2,172.2) 5,174 v6(5,175.004) v6@3.904,175.004
  Bottom Layer w2: v5(2.075,173.35) 3.729,175.004 v6(5,175.004)
  other v1: 16.13,142.807 17.13,142.807 18.13,142.807 19.113,142.805 20.113,142.805 21.113,142.805 298.993,143.207 299.993,143.207 300.993,143.207 301.976,143.205 302.976,143.205 303.976,143.205 16.13,143.843 17.13,143.843 18.13,143.843 19.113,143.841 20.113,143.841 21.113,143.841 298.993,144.242 299.993,144.242 300.993,144.242 301.976,144.24 302.976,144.24 303.976,144.24 16.13,144.839 17.13,144.839 18.13,144.839 19.113,144.837 20.113,144.837 21.113,144.837 298.993,145.239 299.993,145.239 300.993,145.239 301.976,145.237 302.976,145.237 303.976,145.237 16.13,145.875 17.13,145.875 18.13,145.875 19.113,145.873 20.113,145.873 21.113,145.873 298.993,146.274 299.993,146.274 300.993,146.274 301.976,146.272 302.976,146.272 303.976,146.272
  other v5: 5,171.6
  other v6: 110,175 210,175 315,175
VCC: C47.1 C56.2 P8.2 P10.2 U1.8 U1.9 U6.8 U6.9 U10.8 U10.9 U18.1 | length 357.6
  Top Layer w1: P10.2@11.793,49.76 8.5,53.053 8.5,66.539 ; C47.1@11.898,34.362 12,34.464 P10.2@12,49.539 ; P8.2@12,66.539 8.5,66.539 ; U10.9@61.168,98.202 U10.9@61.341,98.029 ; U10.8@63.881,98.029 U10.8@63.881,98.356 ; v1@260.352,102.321 v1(163.474,102.321) 161.011,102.321 v1(160.985,102.347) 160.96,102.321 v1(63.881,102.321) v1(61.341,102.321) 17.171,102.321 11.875,97.025 11.875,78.484 8.5,75.109 8.5,66.539 ; v1@260.452,102.321 v1@263.012,102.321
  Bottom Layer w1: C47.1@11.898,34.285 14.971,34.285 16.327,32.93 C56.2@16.327,31.44 16.335,31.432 U18.1@16.335,28.444 U18.1@16.343,28.452 ; v1(61.341,102.321) 61.361,102.301 U10.9@61.361,97.529 ; U10.8@63.881,98.029 v1(63.881,102.321) ; U6.9@160.934,98.084 160.985,98.135 v1(160.985,102.347) ; U6.8@163.474,98.01 v1(163.474,102.321) ; U1.9@260.472,98.393 v1(260.472,102.313) ; U1.8@263.012,98.385 v1(263.012,102.305)
VCC_ISO: C31.2 C32.1 R75.2 U7.1 U12.4 | length 24
  Bottom Layer w0.5: C32.1@22.125,81.1 22.125,79.475 25.775,75.825 U12.4@25.775,73.465 ; C32.1@22.263,80.963 23.2,81.9 R75.2@26.094,81.9 26.244,81.75 26.482,81.75 27.4,80.832 27.4,75.4 27.9,74.9 30.495,74.9 30.545,74.85 U7.1@30.545,74.8
pads on no net: H1.5 U1.5 U1.6 U1.7 U1.12 U1.13 U1.14 U4.3 U4.14 U6.5 U6.6 U6.7 U6.12 U6.13 U6.14 U8.2 U8.3 U8.4 U8.23 U8.45 U8.53 U8.54 U10.5 U10.6 U10.7 U10.12 U10.13 U10.14 U13.7 U13.12 U13.13 U21.7 U21.12 U21.13 U32.7 U32.12 U32.13

## Polygon pours and split planes (outlines as drawn)
GND_2 on Bottom Layer "NONET_L-01_P-001" (solid, pour order 70): 292.087,48.003 292.082,48.008 280.229,48.008 276.884,51.352 276.884,70.883 304.996,98.995 318.95,98.995 319.125,98.82 319.125,57.5 305.647,57.5 296.15,48.003
GND on Bottom Layer "NONET_L-01_P-001" (solid, pour order 67): 319.999,0 319.895,0.104 319.895,54.3 305.924,54.3 297.662,46.038 279.681,46.038 274.335,51.384 251.925,51.384 219.585,83.725 199.725,83.725 167.501,51.501 153.999,51.501 121.775,83.725 99.7,83.725 67.856,51.881 50.625,51.881 40.75,61.756 33.346,69.16 21.532,69.16 10.744,79.948 10.744,99.05 0,99.05 0,0
"GND -650VDC" on Bottom Layer "NONET_L-01_P-001" (solid, pour order 87): 281.804,106.37 281.804,117.918 287.655,123.769 287.655,127.747 291.434,127.747 295.118,131.432 296.594,131.432 296.993,131.033 296.993,125.482 285.041,113.529 285.041,106.37
NetC84_1 on Bottom Layer "NONET_L-01_P-001" (solid, pour order 86): 241.278,106.445 241.278,118.378 247.53,124.63 247.53,127.822 251.309,127.822 254.993,131.507 256.469,131.507 257.109,130.867 257.109,125.798 244.916,113.604 244.916,106.445
"GND -650VDC" on Bottom Layer "NONET_L-01_P-001" (solid, pour order 85): 180.935,106.32 180.935,117.049 187.605,123.719 187.605,127.697 191.384,127.697 195.068,131.382 196.544,131.382 196.943,130.983 196.943,127.493 184.991,115.541 184.991,106.32
NetC81_1 on Bottom Layer "NONET_L-01_P-001" (solid, pour order 84): 140.93,106.413 140.93,117.03 147.712,123.812 147.712,127.791 151.491,127.791 155.175,131.475 156.652,131.475 157.05,131.077 157.05,125.525 145.098,113.573 145.098,106.413
"GND -650VDC" on Bottom Layer "NONET_L-01_P-001" (solid, pour order 83): 81.879,106.23 81.879,118.754 87.73,124.605 87.73,127.608 91.509,127.608 95.193,131.292 96.669,131.292 97.068,130.894 97.068,127.568 85.116,115.616 85.116,106.23
NetC11_2 on Bottom Layer "NONET_L-01_P-001" (solid, pour order 82): 41.911,106.388 41.911,117.936 47.762,123.787 47.762,127.766 51.541,127.766 55.225,131.45 56.702,131.45 57.1,131.052 57.1,125.5 45.148,113.548 45.148,106.388
NetD24_2 on Bottom Layer "NONET_L-01_P-001" (solid, pour order 81): 263.468,125.576 263.468,120.678 271.755,120.678 274.859,117.575 274.859,105.058 278.873,105.058 279.38,105.565 279.38,118.003 285.376,123.999 285.376,125.576
NetD21_2 on Bottom Layer "NONET_L-01_P-001" (solid, pour order 80): 223.491,125.81 223.491,120.912 231.778,120.912 234.881,117.808 234.881,105.292 238.896,105.292 239.403,105.798 239.403,118.237 245.399,124.233 245.399,125.81
NetD19_2 on Bottom Layer "NONET_L-01_P-001" (solid, pour order 79): 163.703,125.576 163.703,120.678 171.989,120.678 175.093,117.575 175.093,105.058 179.108,105.058 179.614,105.565 179.614,118.003 185.611,123.999 185.611,125.576
NetD17_2 on Bottom Layer "NONET_L-01_P-001" (solid, pour order 78): 123.541,125.81 123.541,120.912 131.828,120.912 134.931,117.808 134.931,105.292 138.946,105.292 139.453,105.798 139.453,118.237 145.449,124.233 145.449,125.81
NetD14_2 on Bottom Layer "NONET_L-01_P-001" (solid, pour order 77): 63.841,125.735 63.841,120.837 72.128,120.837 75.231,117.733 75.231,105.217 79.246,105.217 79.753,105.723 79.753,118.162 85.749,124.158 85.749,125.735
NetD12_2 on Bottom Layer "NONET_L-01_P-001" (solid, pour order 76): 24.013,125.823 24.013,120.925 32.3,120.925 35.403,117.822 35.403,105.305 39.418,105.305 39.925,105.812 39.925,118.25 45.921,124.246 45.921,125.823
PE on Bottom Layer "NONET_L-01_P-001" (solid, pour order 68): 96.71,180.009 117.794,158.925 131.925,158.925 148.025,175.025 171.85,175.025 187.95,158.925 232.375,158.925 248.475,175.025 271.675,175.025 297.55,149.15 297.55,135.034 297.58,135.004 319.999,135.004 319.999,180.003
"+650 VDC" on Bottom Layer "NONET_L-01_P-001" (solid, pour order 49): 251.775,130.369 251.739,130.404 251.739,146.861 244.005,154.595 56.007,154.595 25.675,154.595 25.675,133.442 28.225,130.892 28.225,130.369 31.765,130.369 34.481,133.068 45.559,133.035 48.225,130.369 51.775,130.369 54.445,133.038 125.766,133.068 128.225,130.369 131.775,130.369 134.665,133.259 145.336,133.266 148.233,130.369 151.775,130.369 154.441,133.035 225.559,133.035 228.225,130.369 231.775,130.369 234.441,133.035 245.559,133.035 248.225,130.369
"GND -650VDC" on Bottom Layer "NONET_L-01_P-001" (solid, pour order 75): 23.913,70.225 14.397,79.741 14.397,96.95 24.922,96.95 39.697,82.175 39.697,70.225
GND on Bottom Layer "NONET_L-01_P-001" (solid, pour order 72): 10.526,163.18 10.526,156.217 6.159,151.85 0.038,151.85 0,151.812 0,163.18
PE on Bottom Layer "NONET_L-01_P-001" (solid, remove dead copper, pour order 60): 313.989,180.004 294.775,180.004 294.775,137.809 297.58,135.004 319.999,135.004 319.999,180.003 320,180.004
PE on Bottom Layer "NONET_L-01_P-001" (solid, pour order 64): 23.241,135.004 23.4,135.163 23.4,151.15 21.275,153.275 15.275,153.275 13.175,151.175 13.175,135.275 13.446,135.004
"+650 VDC" on Bottom Layer "NONET_L-01_P-001" (solid, pour order 62): 13.284,158.375 26.036,158.375 29.836,154.575 32.582,154.575 32.582,146.66 26.275,146.66 26.275,151.075 22.346,155.004 13.284,155.004
"GND -650VDC" on Bottom Layer "NONET_L-01_P-001" (solid, pour order 55): 33.463,179.429 33.463,157.4 36.324,157.4 53.584,174.661 66.497,174.661 81.969,159.189 110.62,159.189 90.49,179.319
GND on Top Layer "NONET_L-01_P-001" (solid, pour order 66): 319.551,-0.041 319.447,0.063 319.447,54.334 305.552,54.334 297.215,45.997 280.967,45.997 275.62,51.344 251.478,51.344 219.087,83.734 199.177,83.734 166.903,51.46 151.552,51.46 119.277,83.734 99.452,83.734 67.558,51.84 50.178,51.84 40.302,61.715 32.898,69.119 21.084,69.119 10.652,79.551 10.652,98.909 -0.448,98.909 -0.448,-0.041
NetC11_2 on Top Layer "NONET_L-01_P-001" (solid, pour order 88): 33.559,132.504 33.559,125.641 38.375,120.825 51.6,120.825 51.6,124 45.096,124 40.975,128.121 40.975,132.504
NetC81_1 on Top Layer "NONET_L-01_P-001" (solid, pour order 52): 133.559,130.369 133.559,151.229 155.174,172.844 164.826,172.844 191.775,145.895 191.775,130.369 189.097,130.369 186.461,133.005 173.761,133.005 171.126,130.369 168.726,130.369 166.272,132.823 158.949,132.823 156.495,130.369 154.172,130.369 151.506,133.035 139.193,133.035 136.528,130.369
PE on Top Layer "NONET_L-01_P-001" (solid, pour order 69): 96.71,180.009 117.794,158.925 131.9,158.925 148,175.025 171.875,175.025 187.975,158.925 232.15,158.925 248.25,175.025 271.7,175.025 297.55,149.175 297.55,135.004 319.999,135.004 319.999,180.003
"GND -650VDC" on Top Layer "NONET_L-01_P-001" (solid, pour order 73): 23.691,70.15 15.7,78.141 15.7,95.075 17.575,96.95 24.625,96.95 39.475,82.1 39.475,70.15
GND on Top Layer "NONET_L-01_P-001" (solid, pour order 74): 0.293,96.875 0.306,99.006 9.6,108.3 9.6,117.225 2.625,124.2 2.625,133.051 7.55,133.051 7.55,125 12.35,120.2 12.35,98.75 10.475,96.875
PE on Top Layer "NONET_L-01_P-001" (solid, pour order 58): 0,175.004 0,135.004 24.25,135.004 24.25,159.175 11.506,159.175 5,165.681 5,175.004
GND_2 on Top Layer "NONET_L-01_P-001" (solid, pour order 71): 292.961,47.803 292.956,47.808 283.061,47.808 277.758,53.111 277.758,70.783 304.725,97.75 319.999,97.75 319.999,58.204 306.919,58.204 296.519,47.803
"GND -650VDC" on Top Layer "NONET_L-01_P-001" (solid, pour order 54): 293.89,119.275 300.033,125.418 300.033,131.938 295.128,131.938 290.765,127.575 282.285,127.575 277.922,131.938 275.178,131.938 270.815,127.575 221.734,127.575 216.254,133.055 196.246,133.055 190.765,127.575 181.96,127.575 177.848,131.687 174.882,131.687 170.77,127.575 122.194,127.575 119.411,130.358 95.372,130.358 92.589,127.575 82.58,127.575 78.011,132.144 75.334,132.144 73.559,130.358 73.559,119.275
PE on Top Layer "NONET_L-01_P-001" (solid, pour order 57): 27.25,177.84 24.25,174.84 24.25,160.953 16.25,152.953 16.25,135.022 16.232,135.004 30.25,135.004 30.25,174.84
NetC11_2 on Top Layer "NONET_L-01_P-001" (solid, pour order 51): 33.559,128.534 33.559,147.412 58.991,172.844 63.361,172.844 91.775,144.43 91.775,130.369 89.214,130.369 86.579,133.005 73.787,133.005 71.151,130.369 68.828,130.369 66.374,132.823 59.563,132.823 57.109,130.369 54.274,130.369 51.608,133.035 42.702,133.035 38.202,128.534
"GND -650VDC" on Top Layer "NONET_L-01_P-001" (solid, pour order 56): 34.036,179.346 34.036,160.487 39.472,160.487 53.645,174.661 66.493,174.661 95.326,145.827 95.326,127.575 119.967,127.575 119.967,149.639 90.26,179.346
NetC84_1 on Top Layer "NONET_L-01_P-001" (solid, pour order 53): 233.559,130.369 233.559,151.229 255.174,172.844 264.826,172.844 291.775,145.895 291.775,130.369 288.894,130.369 286.258,133.005 273.634,133.005 270.998,130.369 268.726,130.369 266.272,132.823 259.563,132.823 257.109,130.369 254.419,130.369 251.753,133.035 239.775,133.035 237.109,130.369
PE on Bottom Solder "NONET_L-01_P-001" (solid, pour order 63): 23.241,135.004 23.4,135.163 23.4,151.15 21.275,153.275 13.175,153.275 13.175,135.275 13.446,135.004
PE on Bottom Solder "NONET_L-01_P-001" (solid, pour order 59): 315,175.004 294.775,175.004 294.775,137.809 297.58,135.004 315,135.004

## Keep-outs
Keep-Out Layer:
  circle w0.254: c110,5 r2
  circle w0.254: c110,110.004 r2
  circle w0.254: c210,110.004 r2
  circle w0.254: c210,5 r2
  circle w0.254: c315,110.004 r2
  circle w0.254: c5,110.004 r2
  circle w0.254: c5,5 r2
  circle w0.254: c315,5 r2
  lines w0.2: 5,180.004 ccw(c5,175.004) 0,175.004 0,5 ccw(c5,5) 5,0 315,0 ccw(c315,5) 320,5 ; 5,180.011 315,180.011 ; 23.561,115.508 29.12,115.508 ; 23.561,115.508 cw(c23.561,116.508) 23.561,117.508 29.12,117.508 cw(c29.12,116.508) 29.12,115.508 ; 54.537,51.881 cw(c54.537,53.381) 54.537,54.881 65.136,54.881 cw(c65.136,53.381) 65.136,51.881 54.54,51.881 ; 154.883,51.501 cw(c154.883,53.001) 154.883,54.501 165.483,54.501 cw(c165.483,53.001) 165.483,51.501 154.886,51.501 ; 255.828,51.384 cw(c255.828,52.884) 255.828,54.384 266.427,54.384 cw(c266.427,52.884) 266.427,51.384 255.83,51.384 ; 315,180.004 cw(c315,175.004) 320,175.004 ; 319.999,5 319.999,175.004 ; 2.441,115.425 cw(c2.441,116.425) 2.441,117.425 8,117.425 cw(c8,116.425) 8,115.425 2.441,115.425 ; 13.588,115.484 cw(c13.588,116.484) 13.588,117.484 19.147,117.483 cw(c19.147,116.484) 19.147,115.484 13.588,115.483 ; 52.794,115.45 cw(c52.794,116.45) 52.794,117.45 68.393,117.45 cw(c68.393,116.45) 68.393,115.45 52.794,115.45 ; 88.34,115.436 cw(c88.34,116.436) 88.34,117.436 103.94,117.435 cw(c103.94,116.436) 103.94,115.436 88.34,115.435 ; 116.19,115.386 cw(c116.19,116.386) 116.19,117.386 131.79,117.385 cw(c131.79,116.386) 131.79,115.386 116.19,115.385 ; 151.981,115.386 cw(c151.981,116.386) 151.981,117.386 167.58,117.385 cw(c167.58,116.386) 167.58,115.386 151.981,115.385 ; 188.165,115.361 cw(c188.165,116.361) 188.165,117.361 203.765,117.36 cw(c203.765,116.361) 203.765,115.361 188.165,115.36 ; 215.965,115.386 cw(c215.965,116.386) 215.965,117.386 231.565,117.385 cw(c231.565,116.386) 231.565,115.386 215.965,115.385 ; 251.265,115.436 cw(c251.265,116.436) 251.265,117.436 266.865,117.435 cw(c266.865,116.436) 266.865,115.436 251.265,115.435 ; 292.305,115.425 cw(c292.305,116.425) 292.305,117.425 307.904,117.425 cw(c307.904,116.425) 307.904,115.425 292.305,115.425

## Other copper
Top Layer:
  pour cut-out: 247.95,12.25 247.95,8.4 256.575,8.4 256.575,12.25
Bottom Layer:
  rectangle net NetC80_1: 13.25,158.8 20.85,180.048
  rectangle net "GND -650VDC": 34.036,160.487 39.392,179.131
  pour cut-out: 218.975,8.2 218.975,2.325 250.413,2.325 256.725,8.637 256.725,11.15 255.95,11.925 248.21,11.925 244.485,8.2
Multi-Layer:
  pour cut-out: 160.027,136.581 cw(c160.027,140.081) 156.527,140.081 cw(c160.027,140.081) 160.027,143.581 cw(c160.027,140.081) 163.527,140.081 cw(c160.027,140.081)
  pour cut-out: 160,146.504 cw(c160,150.004) 156.5,150.004 cw(c160,150.004) 160,153.504 cw(c160,150.004) 163.5,150.004 cw(c160,150.004)
  pour cut-out: 206,5 ccw(c210,5) 210,1 ccw(c210,5) 214,5 ccw(c210,5) 210,9 ccw(c210,5)
  pour cut-out: 105.965,5 ccw(c109.965,5) 109.965,1 ccw(c109.965,5) 113.965,5 ccw(c109.965,5) 109.965,9 ccw(c109.965,5)
  pour cut-out: 315,0 cw(c315,5) 310,5 cw(c315,5) 315,10 cw(c315,5) 320,5 cw(c315,5)
  pour cut-out: 5,0 cw(c5,5) 0,5 cw(c5,5) 5,10 cw(c5,5) 10,5 cw(c5,5)

## Silkscreen, mask and mechanical layers (free items; w line width, h text height)
Top Overlay:
  circle w2: c110,5 r3
  circle w2: c110,110.004 r3
  circle w2: c210,110.004 r3
  circle w2: c210,5 r3
  circle w2: c315,110.004 r3
  circle w2: c5,110.004 r3
  circle w2: c5,5 r3
  circle w2: c315,5 r3
  lines w0.5: 0.457,116.418 319.583,116.418
  text "HV_VCC" at 11.746,170.804 h1.5 r90
  text "HV_GND" at 43.997,170.393 h1.5 r90
  text "6_E" at 289.851,109.222 h1.5 r90
  text "6_G" at 272.402,109.197 h1.5 r90
  text "5_E" at 249.11,109.146 h1.5 r90
  text "5_G" at 231.99,108.816 h1.5 r90
  text "3_G" at 131.609,108.765 h1.5 r90
  text "4_E" at 189.09,108.613 h1.5 r90
  text "1_G" at 31.711,108.511 h1.5 r90
  text "4_G" at 172.326,108.511 h1.5 r90
  text "2_G" at 69.887,108.384 h1.5 r90
  text "3_E" at 149.212,108.384 h1.5 r90
  text "1_E" at 50.253,108.333 h1.5 r90
  text "2_E" at 88.429,107.749 h1.5 r90
  text "A" at 304.925,94.425 h2 r90
  text "G" at 305.025,89.225 h2 r90
  text "B" at 305.025,84.325 h2 r90
  text "GND" at 1.396,70.981 h1 r90
  text "A" at 305.129,69.566 h2 r90
  text "VCC" at 1.396,65.59 h1 r90
  text "G" at 305.256,64.585 h2 r90
  text "B" at 305.236,59.332 h2 r90
  text "V3V" at 221.704,57.704 h0.8
  text "V3V" at 240.229,57.679 h0.8
  text "5V1" at 240.269,55.126 h0.8
  text "5V1" at 222.529,54.854 h0.8
  text "GND" at 1.396,54.416 h1 r90
  text "V3V" at 117.996,53.804 h0.8
  text "RX" at 222.804,52.304 h0.8
  text "LED1" at 240.229,52.154 h0.8
  text "5V1" at 118.25,51.036 h0.8
  text "GND" at 188.456,49.956 h0.8 r90
  text "LED2" at 240.234,49.884 h0.8
  text "5V" at 215.031,49.781 h0.8 r90
  text "GND" at 179.656,49.706 h0.8 r90
  text "5V" at 206.406,49.706 h0.8 r90
  text "TIM2" at 190.947,49.596 h0.8 r90
  text "TX" at 222.804,49.558 h0.8
  text "TIM1" at 182.117,49.495 h0.8 r90
  text "5V" at 184.907,49.495 h0.8 r90
  text "5V" at 194.078,49.342 h0.8 r90
  text "SENS_3" at 217.798,49.304 h0.8 r90
  text "GND" at 220.154,49.258 h0.8 r90
  text "GND" at 211.529,49.183 h0.8 r90
  text "GND" at 202.654,49.133 h0.8 r90
  text "SENS_1" at 200.08,48.954 h0.8 r90
  text "SENS_2" at 208.675,48.954 h0.8 r90
  text "LED_6" at 118.044,48.626 h0.8
  text "VCC" at 1.396,47.818 h1 r90
  text "LED3" at 240.234,47.506 h0.8
  text "DIR" at 222.429,46.979 h0.8
  text "LED_5" at 118.143,46.001 h0.8
  text "GND" at 240.234,44.966 h0.8
  text "GND" at 222.291,44.362 h0.8
  text "LED_4" at 118.214,43.595 h0.8
  text "GND" at 118.268,40.605 h0.8
  text "GND" at 240.526,26.086 h0.8
  text "GND" at 222.829,25.835 h0.8
  text "MOSI" at 240.704,23.32 h0.8
  text "MOSI" at 222.491,23.16 h0.8
  text "MISO" at 240.704,20.78 h0.8
  text "MISO" at 222.491,20.62 h0.8
  text "SCK" at 240.704,18.24 h0.8
  text "SCK" at 222.491,18.08 h0.8
  text "CS2" at 222.662,15.753 h0.8
  text "CS3" at 240.704,15.7 h0.8
  text "5V1" at 240.635,13.109 h0.8
  text "5V1" at 223.529,13.029 h0.8
  text "RX" at 170.871,1.354 h0.8 r90
  text "GND" at 33.338,1.299 h1 r90
  text "DIO" at 163.121,1.304 h0.8 r90
  text "SCK" at 165.746,1.304 h0.8 r90
  text "SWO" at 168.371,1.304 h0.8 r90
  text "GND" at 173.396,1.304 h0.8 r90
  text "V3V" at 160.896,1.254 h0.8 r90
  text "TIM_1_BKN" at 260.704,1.246 h1
  text "VCC_SERVO" at 15.574,0.979 h1 r90
Bottom Overlay:
  circle w2: c110.111,5.002 r3
  circle w2: c210.111,5.002 r3
  circle w2: c314.918,5.021 r3
  circle w2: c315.111,110.005 r3
  circle w2: c209.918,110.024 r3
  circle w2: c109.918,110.024 r3
  circle w2: c5.111,110.005 r3
  circle w2: c5.111,5.002 r3
  lines w0.5: 5.175,164.125 5.175,167.55 ; 12.984,158.55 22.249,158.55 22.362,158.663 22.362,180.011 ; 32.112,157.4 32.112,179.659
  lines w1: 11.3,154.175 21.958,154.175 24.7,151.433 24.7,134.125
Top Solder:
  lines w3: 75.188,130.15 75.188,129.637 83.784,121.041 289.052,121.041 295.275,127.264 295.275,130.388 295.079,130.585
Bottom Solder:
  lines w0.5: 23.453,157.2 23.875,157.2
  lines w2: 13.675,157.2 23.453,157.2 ; 23.875,157.2 30.775,150.3
  lines w3: 44.196,174.127 47.676,177.607 87.427,177.607 100.127,164.907

## Text inside footprints (layer, text, board x,y; h text height)
C47: Top Overlay "+" at 13.168,32.717 h0.8 r180; Top Overlay "-" at 6.437,32.475 h0.8 r180
C55: Top Overlay "-" at 6.437,15.076 h0.8 r180; Top Overlay "+" at 13.168,15.318 h0.8 r180
U1: Top Overlay "-18V_1" at 272.638,96.07 h1.3 r270; Top Overlay "-18V_1" at 275.178,96.07 h1.3 r270; Top Overlay "+18V_1" at 277.717,96.07 h1.3 r270; Top Overlay "+18V_1" at 280.257,96.07 h1.3 r270; Top Overlay "+18V_2" at 237.081,96.349 h1.3 r270; Top Overlay "+18V_2" at 239.621,96.349 h1.3 r270; Top Overlay "-18V_2" at 242.161,96.349 h1.3 r270; Top Overlay "-18V_2" at 244.7,96.349 h1.3 r270; Top Overlay "+12V" at 263.463,90.679 h1.3 r90; Top Overlay "GND" at 255.845,91.319 h1.3 r90; Top Overlay "GND" at 258.385,91.319 h1.3 r90; Top Overlay "+12V" at 260.923,90.679 h1.3 r90; Bottom Overlay "+18V_2" at 237.081,89.583 h1.3 r270; Bottom Overlay "+18V_2" at 239.621,89.583 h1.3 r270; Bottom Overlay "-18V_2" at 242.161,89.583 h1.3 r270; Bottom Overlay "-18V_2" at 244.7,89.583 h1.3 r270; Bottom Overlay "GND" at 254.429,91.319 h1.3 r270; Bottom Overlay "GND" at 256.969,91.319 h1.3 r270; Bottom Overlay "+12V" at 259.505,90.679 h1.3 r270; Bottom Overlay "+12V" at 262.045,90.679 h1.3 r270; Bottom Overlay "-18V_1" at 272.638,89.862 h1.3 r270; Bottom Overlay "-18V_1" at 275.178,89.862 h1.3 r270; Bottom Overlay "+18V_1" at 277.717,89.862 h1.3 r270; Bottom Overlay "+18V_1" at 280.257,89.862 h1.3 r270